# Altium PCB Copy of PCB.PcbDoc (part 4 of 5)
Units mm, origin at the board's own origin, x right, y up, seen from the top; angles counter-clockwise.
Board outline 130 x 115.04 mm, 6 copper layers (Top Layer, Int1 (GND), Int2, Int3 (PWR), Int4 (GND), Bottom Layer), stack 1.647 mm thick; 306 components, 246 nets, 1107 pads, 360 vias.
Unrouted connection lines stored in the file: 123.
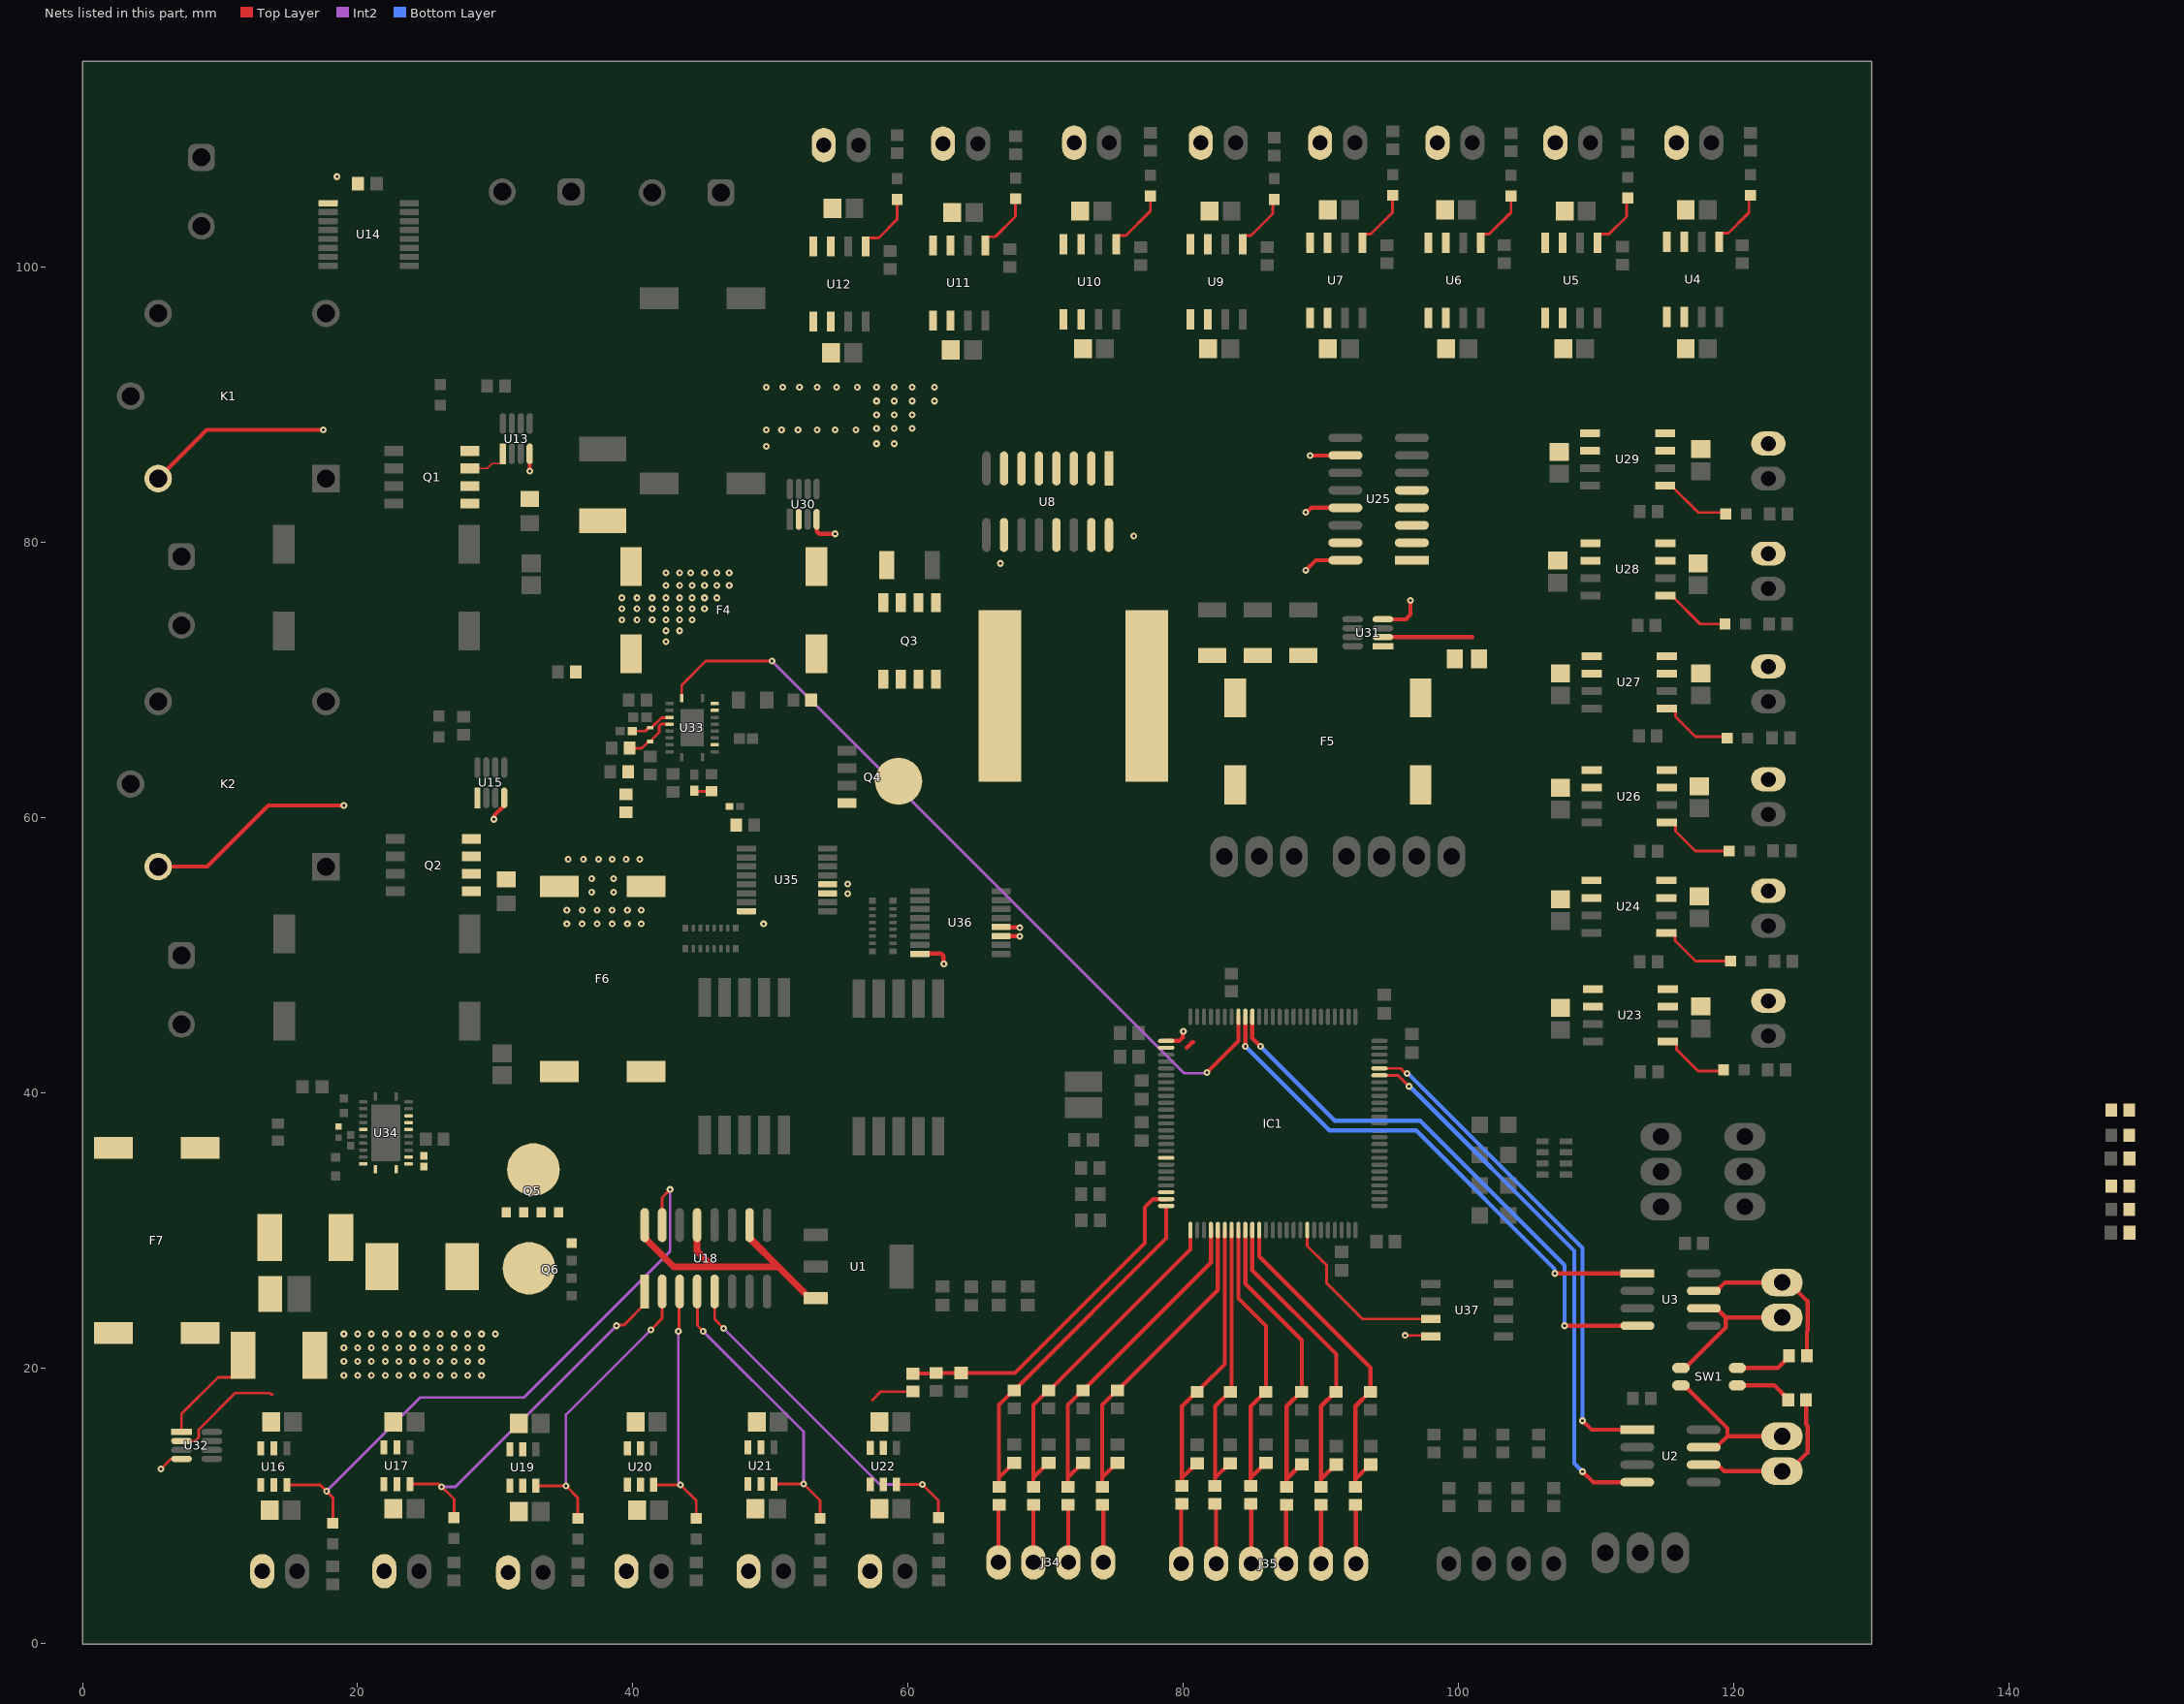
[diagram p6: the nets of this part, all layers, seen from the top]

## Part data (continued)
Y1: library part NX3225GD-8MHZ-STD-CRA-3, "CRYSTAL 8.0000MHZ 8PF SMD", ESR (Equivalent Series Resistance)="500 Ohms", Frequency Stability=±150ppm, Frequency Tolerance=±50ppm, Load Capacitance=8pF, manufacturer="NDK America, Inc.", Operating Mode=Fundamental, Operating Temperature="-40°C ~ 150°C", Package / Case="2-SMD, No Lead", Ratings=AEC-Q200, Supplier Part Number 1=644-1178-1-ND, componentlink1description=Datasheet, componentlink1url=http://www.ndk.com/images/products/catalog/c_NX3225GD-STD-CRA-3_e.pdf, componentlink2description="DigiKey Link", componentlink2url=https://www.digikey.com/en/products/detail/ndk-america-inc/NX3225GD-8MHZ-STD-CRA-3/3125637, Frequency="8 MHz", Height - Seated (Max)="0.039\" (1.00mm)", lastupdated="2/1/2024 9:48:41 PM", Lifecycle Status=Active, Minimum Order=1, Mounting Type="Surface Mount", packaging=TapeAndReel, Part Number=NX3225GD-8MHZ-STD-CRA-3, Part Status=Active, partid=744, price=0.48, series=NX3225GD, Size / Dimension="0.126\" L x 0.098\" W (3.20mm x 2.50mm)", Supplier 1=DigiKey, Type="MHz Crystal"

## Via types
v1: diameter 0.5, hole 0.2, Top Layer to Bottom Layer, 354 vias
v2: diameter 1, hole 0.75, Top Layer to Bottom Layer, 6 vias

## Nets (pads, with @x,y where several pads share a name; then routed paths per layer and width w, separated by ;. In a path a pad name is that pad's centre, name@x,y a point inside that pad or via, vN(x,y) a via of type N, cw(c..) or ccw(c..) an arc to the next point about the centre after c; other vN are vias at no path point)
5V_1_EN: D15.1 U16.3 U18.15 | length 45.1
  Top Layer w0.2: U16.3@14.85,11.531 17.269,11.531 v1(17.735,11.065) 18.2,10.6 D15.1@18.2,8.75 ; U18.15@42.125,30.416 42.125,32.425 v1(42.7,33)
  Int2 w0.2: v1(17.735,11.065) 24.552,17.883 32.083,17.883 42.7,28.5 v1(42.7,33)
5V_1_POWER: C37.2 J19.2 U16.1 U16.2
5V_2_EN: D16.1 U17.3 U18.1 | length 26.2
  Top Layer w0.2: U17.3@23.8,11.597 25.903,11.597 27,10.5 D16.1@27,9.15 ; v1(38.8,23.1) 38.853,23.153 39.35,23.153 40.855,24.658 U18.1@40.855,25.584
  Int2 w0.2: v1(26.1,11.4) 27.1,11.4 v1(38.8,23.1)
5V_2_POWER: C39.2 J20.2 U17.1 U17.2
5V_3_EN: D17.1 U18.2 U19.3 | length 21.9
  Top Layer w0.2: U19.3@32.95,11.466 v1(35.134,11.466) 36,10.6 D17.1@36,9.1 ; v1(41.3,22.8) 42.125,23.625 U18.2@42.125,25.584
  Int2 w0.2: v1(35.134,11.466) 35.134,16.633 v1(41.3,22.8)
5V_3_POWER: C41.2 J21.2 U19.1 U19.2
5V_4_EN: D18.1 U18.3 U20.3 | length 19
  Top Layer w0.2: U20.3@41.5,11.533 v1(43.467,11.533) 44.6,10.4 D18.1@44.6,9.1 ; v1(43.3,22.7) 43.348,22.748 43.348,25.536 U18.3@43.395,25.584
  Int2 w0.2: v1(43.3,22.7) 43.3,11.781 43.467,11.614 v1(43.467,11.533)
5V_4_POWER: C43.2 J22.2 U20.1 U20.2
5V_5_EN: D19.1 U18.4 U21.3 | length 22.3
  Top Layer w0.2: U18.4@44.665,25.584 44.683,25.566 44.683,23.118 v1(45.1,22.7) ; U21.3@50.25,11.6 v1(52.4,11.6) 53.6,10.4 D19.1@53.6,9.1
  Int2 w0.2: v1(45.1,22.7) 52.4,15.4 v1(52.4,11.6)
5V_5_POWER: C45.2 J23.2 U21.1 U21.2
5V_6_EN: D20.1 U18.5 U22.3 | length 26.9
  Top Layer w0.2: U18.5@45.935,25.584 45.935,23.565 v1(46.6,22.9) ; U22.3@59.15,11.566 v1(61.033,11.566) 62.2,10.4 D20.1@62.2,9.15
  Int2 w0.2: v1(46.6,22.9) 57.934,11.566 v1(61.033,11.566)
5V_6_POWER: C47.2 J24.2 U22.1 U22.2
5V_MCU_SENSE: C62.2 IC1.24 R29.2 R30.1 | length 25.2
  Top Layer w0.3: R29.2@60.343,19.613 60.368,19.638 62.018,19.638 R30.1@62.043,19.663 C62.2@63.843,19.663 67.763,19.663 77.2,29.1 77.2,31.7 77.8,32.3 IC1.24@78.75,32.3
5VCC: C34.2 C36.2 C38.2 C40.2 C42.2 C44.2 C46.2 K1.2 K2.2 R28.2 R29.1 U1.3 U8.10 U8.13 U8.16 U13.4 U14.9 U15.4 U16.5 U16.6 U17.5 U17.6 U18.10 U18.13 U18.16 U19.5 U19.6 U20.5 U20.6 U21.5 U21.6 U22.5 U22.6 U25.10 U25.13 U25.16 U30.4 U31.4 U32.2 U32.4 U35.3 U35.4 U35.16 U36.3 U36.4 U36.16 U37.8 | length 89.1
  Top Layer w0.2: v1(5.7,12.7) 6.4,13.4 7.175,13.4 U32.4@7.2,13.425 ; U32.2@7.2,14.725 8.183,14.725 8.441,14.983 8.441,15.545 11.096,18.2 13.6,18.2 13.686,18.114 13.798,18.114 ; 57.4,17.7 58.013,18.313 R29.1@60.343,18.313 ; v1(96.1,22.4) 97.894,22.4 U37.8@97.968,22.327
  Top Layer w0.3: K2.2@5.5,56.464 9.064,56.464 13.5,60.9 v1(19,60.9) ; K1.2@5.5,84.664 9.036,88.2 v1(17.5,88.2) ; v1(29.9,59.9) 29.938,59.938 29.938,60.202 30.65,60.914 U15.4@30.65,61.464 ; v1(32.5,85.2) U13.4@32.5,86.464 ; U30.4@53.35,81.7 53.375,81.675 53.375,80.825 53.55,80.65 v1(54.7,80.65) ; U36.16@60.85,50.125 60.875,50.15 62.386,50.15 62.562,49.974 62.562,49.438 v1(62.6,49.4) ; U36.3@66.75,51.425 66.763,51.413 68.087,51.413 v1(68.1,51.4) ; U36.4@66.75,52.075 66.771,52.054 68.076,52.054 v1(68.112,52.018) ; v1(88.9,78) 89.63,78.73 U25.16@91.768,78.73 ; v1(88.9,82.225) 88.954,82.225 89.269,82.54 U25.13@91.768,82.54 ; v1(89.2,86.325) 89.212,86.337 91.755,86.337 U25.10@91.768,86.35 ; U31.4@94.5,74.439 96.164,74.439 96.5,74.775 v1(96.5,75.8)
  Top Layer w0.5: U18.16@40.855,30.416 40.855,29.49 42.962,27.383 45.8,27.383 ; U18.13@44.665,30.416 44.665,28.518 45.8,27.383 ; U18.10@48.475,30.416 48.475,29.475 50.567,27.383 ; U1.3@53.275,25.1 52.85,25.1 50.567,27.383 ; 45.8,27.383 50.567,27.383
  other v1: 19,19.5 20,19.5 21,19.5 22,19.5 23,19.5 24,19.5 25,19.5 26,19.5 27,19.5 28,19.5 29,19.5 19,20.5 20,20.5 21,20.5 22,20.5 23,20.5 24,20.5 25,20.5 26,20.5 27,20.5 28,20.5 29,20.5 19,21.5 20,21.5 21,21.5 22,21.5 23,21.5 24,21.5 25,21.5 26,21.5 27,21.5 28,21.5 29,21.5 19,22.5 20,22.5 21,22.5 22,22.5 23,22.5 24,22.5 25,22.5 26,22.5 27,22.5 28,22.5 29,22.5 30,22.5 49.5,52.3 55.6,54.5 55.6,55.2 66.7,78.5 76.4,80.5 18.5,106.6
5VCC_NOSENS: F7.2_1 F7.2_2 R28.1 U32.1 | length 8
  Top Layer w0.2: U32.1@7.2,15.375 7.2,16.7 9.855,19.355 10.875,19.355 11.675,20.155 R28.1@11.675,20.955
5VREG_HO: Q5.4 U34.13
5VREG_IN: F6.2_1 F6.2_2 Q5.5-6-7-8 U34.12 U34.19
5VREG_ISNS+: L2.2 R42.1 U34.20
5VREG_LO: Q6.4 U34.11
5VREG_OUT: C74.1 L2.1 Q5.1 Q5.2 Q5.3 Q6.5-6-7-8 U34.14
5VREG_VOUT: C77.1 F7.1_1 F7.1_2 R42.2 U34.21
12V_1_EN: D21.1 U23.5 U25.15 | length 5.2
  Top Layer w0.2: U23.5@115.2,43.754 115.651,43.754 115.831,43.575 115.831,43.169 117.4,41.6 119.15,41.6 D21.1@119.25,41.7
12V_1_POWER: C49.2 J25.1 U23.7 U23.8
12V_2_EN: D22.1 U24.5 U25.1 | length 5.7
  Top Layer w0.2: U24.5@115.1,51.654 115.551,51.654 115.731,51.475 115.731,51.069 117.2,49.6 D22.1@119.75,49.6
12V_2_POWER: C51.2 J26.1 U24.7 U24.8
12V_3_EN: D23.1 U25.2 U26.5 | length 5.6
  Top Layer w0.2: U26.5@115.125,59.659 115.576,59.659 115.756,59.48 115.756,59.044 117.2,57.6 D23.1@119.65,57.6
12V_3_POWER: C53.2 J27.1 U26.7 U26.8
12V_4_EN: D24.1 U25.3 U27.5 | length 5.5
  Top Layer w0.2: U27.5@115.125,67.959 115.576,67.959 115.756,67.78 115.756,67.344 117.2,65.9 119.4,65.9 D24.1@119.5,65.8
12V_4_POWER: C55.2 J28.1 U27.7 U27.8
12V_5_EN: D25.1 U25.4 U28.5 | length 5.2
  Top Layer w0.2: U28.5@115.025,76.159 115.476,76.159 117.535,74.1 D25.1@119.35,74.1
12V_5_POWER: C57.2 J29.1 U28.7 U28.8
12V_6_EN: D26.1 U25.5 U29.5 | length 5.3
  Top Layer w0.2: U29.5@115,84.154 115.451,84.154 117.405,82.2 119.3,82.2 D26.1@119.4,82.1
12V_6_POWER: C59.2 J30.1 U29.7 U29.8
12V_MCU_SENSE: C61.2 IC1.23 R26.2 R27.1
12V_REG_EN: IC1.93 R31.1 U33.1 | length 57.2
  Top Layer w0.2: U33.1@43.55,68.714 43.55,69.65 45.3,71.4 v1(50.1,71.4)
  Top Layer w0.3: v1(81.7,41.5) 84,43.8 IC1.93@84,45.55
  Int2 w0.2: v1(50.1,71.4) 80.05,41.45 81.65,41.45 v1(81.7,41.5)
12VCC: C48.1 C50.1 C52.1 C54.1 C56.1 C58.1 R23.2 R26.1 U23.1 U23.2 U24.1 U24.2 U26.1 U26.2 U27.1 U27.2 U28.1 U28.2 U29.1 U29.2 U31.2 | length 6.5
  Top Layer w0.3: U31.2@94.5,73.139 100.986,73.139 101,73.125
12VCC_NOSENS: F5.2_1 F5.2_2 R23.1 U31.1
12VREG_HO: Q3.4 U33.18
12VREG_IN: C64.2 F4.2_1 F4.2_2 Q3.5 Q3.6 Q3.7 Q3.8 R32.2
12VREG_LO: Q4.4 U33.13
12VREG_OUT: C65.2 C66.2 C67.2 F5.1_1 F5.1_2 L1.1 R34.2 R35.2
12VREG_SW: C68.2 L1.2 Q3.1 Q3.2 Q3.3 Q4.5-6-7-8 R37.2 U33.19 | length 1.2
  Top Layer w0.2: R37.2@44.475,61.989 44.525,61.939 C68.2@45.7,61.939
24V_1_EN: D5.1 U4.5 U8.15 | length 4.6
  Top Layer w0.2: U4.5@118.94,101.864 118.94,102.315 119.119,102.495 119.595,102.495 121.1,104 121.1,105.15 D5.1@121.2,105.25
24V_1_POWER: C18.2 J8.1 U4.7 U4.8
24V_2_EN: D6.1 U5.5 U8.1 | length 4.5
  Top Layer w0.2: U5.5@110.105,101.789 110.105,102.24 110.284,102.42 110.92,102.42 112.2,103.7 112.2,104.95 D6.1@112.3,105.05
24V_2_POWER: C20.2 J9.1 U5.7 U5.8
24V_3_EN: D7.1 U6.5 U8.2 | length 4.6
  Top Layer w0.2: U6.5@101.605,101.789 101.605,102.24 101.784,102.42 102.22,102.42 103.8,104 D7.1@103.8,105.2
24V_3_POWER: C22.2 J10.1 U6.7 U6.8
24V_4_EN: D8.1 U7.5 U8.3 | length 4.6
  Top Layer w0.2: U7.5@93.005,101.789 93.005,102.24 93.184,102.42 93.62,102.42 95.2,104 D8.1@95.2,105.25
24V_4_POWER: C24.2 J11.1 U7.7 U7.8
24V_5_EN: D9.1 U8.4 U9.5 | length 4.5
  Top Layer w0.2: U9.5@84.305,101.689 84.305,102.14 84.484,102.32 84.92,102.32 86.5,103.9 86.5,104.85 D9.1@86.6,104.95
24V_5_POWER: C26.2 J12.1 U9.7 U9.8
24V_6_EN: D10.1 U8.5 U10.5 | length 4.9
  Top Layer w0.2: U10.5@75.105,101.689 75.105,102.14 75.284,102.32 75.82,102.32 77.6,104.1 D10.1@77.6,105.2
24V_6_POWER: C28.2 J13.1 U10.7 U10.8
24V_7_EN: D11.1 U8.6 U11.5 | length 4.6
  Top Layer w0.2: U11.5@65.61,101.6 65.61,102.051 65.789,102.231 66.331,102.231 67.8,103.7 D11.1@67.8,105
24V_7_POWER: C30.2 J14.1 U11.7 U11.8
24V_8_EN: D12.1 U8.7 U12.5 | length 4.8
  Top Layer w0.2: U12.5@56.905,101.525 56.905,101.976 57.084,102.156 57.856,102.156 59.2,103.5 D12.1@59.2,104.95
24V_8_POWER: C32.2 J15.1 U12.7 U12.8
24V_MCU_SENSE: C60.2 IC1.18 R24.2 R25.1
24VCC: C17.1 C19.1 C21.1 C23.1 C25.1 C27.1 C29.2 C31.2 F4.1_1 F4.1_2 F6.1_1 F6.1_2 R22.2 R24.1 U4.1 U4.2 U5.1 U5.2 U6.1 U6.2 U7.1 U7.2 U9.1 U9.2 U10.1 U10.2 U11.1 U11.2 U12.1 U12.2 U30.2
  other v1: 35.2,52.3 36.3,52.3 37.4,52.3 38.5,52.3 39.6,52.3 40.6,52.3 35.2,53.3 36.3,53.3 37.4,53.3 38.5,53.3 39.6,53.3 40.6,53.3 37,54.6 38.6,54.6 37,55.6 38.6,55.6 35.3,57 36.4,57 37.5,57 38.5,57 39.5,57 40.5,57 42.4,72.8 42.4,73.6 43.4,73.6 39.2,74.4 40.3,74.4 41.4,74.4 42.4,74.4 43.4,74.4 44.3,74.4 39.2,75.2 40.3,75.2 41.4,75.2 42.4,75.2 43.4,75.2 44.3,75.2 45.2,75.2 39.2,76 40.3,76 41.4,76 42.4,76 43.4,76 44.3,76 45.2,76 46.1,76 42.4,76.9 43.4,76.9 44.3,76.9 45.2,76.9 46.1,76.9 47,76.9 42.4,77.8 43.4,77.8 44.2,77.8 45.2,77.8 46.1,77.8 47,77.8 49.7,87 57.7,87.2 59,87.2 49.7,88.2 50.8,88.2 52,88.2 53.4,88.2 54.7,88.2 56.2,88.2 57.7,88.3 59,88.3 60.3,88.3 57.7,89.3 59,89.3 60.3,89.3 57.7,90.3 59,90.3 60.3,90.3 61.9,90.3 49.7,91.3 50.9,91.3 52.1,91.3 53.4,91.3 54.8,91.3 56.3,91.3 57.7,91.3 59,91.3 60.3,91.3 61.9,91.3
Ain_5V1: J34.1 R74.2 | length 4.2
  Top Layer w0.3: R74.2@74.1,10.1 74.18,10.02 J34.1@74.18,5.9
Ain_5V2: J34.2 R76.2 | length 4.2
  Top Layer w0.3: R76.2@71.6,10.1 71.64,10.06 J34.2@71.64,5.9
Ain_5V3: J34.3 R78.2 | length 4.2
  Top Layer w0.3: J34.3@69.1,5.9 R78.2@69.1,10.1
Ain_5V4: J34.4 R80.2 | length 4.2
  Top Layer w0.3: J34.4@66.56,5.9 66.56,10.06 R80.2@66.6,10.1
Ain_12V1: J35.1 R82.1 | length 4.3
  Top Layer w0.3: R82.1@92.5,10.1 92.54,10.06 J35.1@92.54,5.8
Ain_12V2: J35.2 R84.1 | length 4.3
  Top Layer w0.3: J35.2@90,5.8 R84.1@90,10.1
Ain_12V3: J35.3 R86.1 | length 4.3
  Top Layer w0.3: J35.3@87.46,5.8 87.46,10.06 R86.1@87.5,10.1
Ain_12V4: J35.4 R88.1 | length 4.4
  Top Layer w0.3: R88.1@84.9,10.15 84.92,10.13 J35.4@84.92,5.8
Ain_12V5: J35.5 R90.1 | length 4.4
  Top Layer w0.3: R90.1@82.3,10.15 82.38,10.07 J35.5@82.38,5.8
Ain_12V6: J35.6 R92.1 | length 4.4
  Top Layer w0.3: J35.6@79.84,5.8 79.84,10.09 R92.1@79.9,10.15
Analog_5V1: C78.1 IC1.30 R73.2 R74.1 | length 23.7
  Top Layer w0.3: R74.1@74.1,11.4 74.1,12.075 ; C78.1@75.2,13.125 75.15,13.125 74.1,12.075 ; IC1.30@82.5,30.05 82.5,25.7 75.525,18.725 75.525,18.675 75.25,18.4 R73.2@75.2,18.4 75.15,18.4 74.1,17.35 74.1,12.075
Analog_5V2: C79.1 IC1.29 R75.2 R76.1 | length 24.6
  Top Layer w0.3: R76.1@71.6,11.4 71.6,12.075 ; C79.1@72.7,13.125 72.65,13.125 71.6,12.075 ; IC1.29@82,30.05 82,27.7 73.025,18.725 73.025,18.675 72.75,18.4 R75.2@72.7,18.4 72.65,18.4 71.6,17.35 71.6,12.075
Analog_5V3: C80.1 IC1.26 R77.2 R78.1 | length 25
  Top Layer w0.3: R78.1@69.1,11.4 69.1,12.075 ; C80.1@70.2,13.125 70.15,13.125 69.1,12.075 ; IC1.26@80.5,30.05 80.5,28.65 70.25,18.4 R77.2@70.2,18.4 70.15,18.4 69.1,17.35 69.1,12.075
Analog_5V4: C81.1 IC1.25 R79.2 R80.1 | length 27
  Top Layer w0.3: R80.1@66.6,11.4 66.6,12.1 ; C81.1@67.7,13.125 67.65,13.125 66.625,12.1 66.6,12.1 ; IC1.25@78.75,31.8 78.75,29.45 68.025,18.725 68.025,18.675 67.75,18.4 R79.2@67.7,18.4 67.65,18.4 66.6,17.35 66.6,12.1
Analog_12V1: C82.1 IC1.36 R81.1 R82.2 | length 24
  Top Layer w0.3: IC1.36@85.5,30.05 85.5,28.138 93.6,20.038 R81.1@93.6,18.3 93.55,18.3 92.5,17.25 92.5,11.95 ; R82.2@92.5,11.4 92.5,11.95 ; C82.1@93.6,13 93.55,13 92.5,11.95
Analog_12V2: C83.1 IC1.35 R83.1 R84.2 | length 23.2
  Top Layer w0.3: IC1.35@85,30.05 85,27.138 91.1,21.038 R83.1@91.1,18.3 91.05,18.3 90,17.25 90,11.95 ; R84.2@90,11.4 90,11.95 ; C83.1@91.1,13 91.05,13 90,11.95
Analog_12V3: C84.1 IC1.34 R85.1 R86.2 | length 22.4
  Top Layer w0.3: IC1.34@84.5,30.05 84.5,26.138 88.6,22.038 R85.1@88.6,18.3 88.55,18.3 87.5,17.25 87.5,11.975 ; R86.2@87.5,11.4 87.5,11.975 ; C84.1@88.6,13.025 88.55,13.025 87.5,11.975
Analog_12V4: C85.1 IC1.33 R87.1 R88.2 | length 21.4
  Top Layer w0.3: IC1.33@84,30.05 84,25.088 86,23.088 R87.1@86,18.3 85.95,18.3 84.9,17.25 84.9,12.075 ; R88.2@84.9,11.45 84.9,12.075 ; C85.1@86,13.125 85.95,13.125 84.9,12.075
Analog_12V5: C86.1 IC1.32 R89.1 R90.2 | length 20.7
  Top Layer w0.3: R90.2@82.3,11.45 82.3,12.05 ; C86.1@83.4,13.1 83.35,13.1 82.3,12.05 ; IC1.32@83.5,30.05 83.5,18.4 R89.1@83.4,18.3 83.35,18.3 82.3,17.25 82.3,12.05
Analog_12V6: C87.1 IC1.31 R91.1 R92.2 | length 21.5
  Top Layer w0.3: R92.2@79.9,11.45 79.9,12.05 ; C87.1@81,13.1 80.95,13.1 79.9,12.05 ; IC1.31@83,30.05 83,20.3 81.325,18.625 81.325,18.575 81.05,18.3 R91.1@81,18.3 80.95,18.3 79.9,17.25 79.9,12.05
CAN1_N: J6.1 R5.2 U2.6 | length 12.2
  Top Layer w0.3: U2.6@117.8,13 118.811,13 119.281,12.53 J6.1@123.5,12.53 124,12.53 125.35,13.88 125.35,15.828 125.25,15.928 R5.2@125.25,17.7
CAN1_P: J6.2 SW1.4 U2.7 | length 11.3
  Top Layer w0.3: SW1.4@116.15,18.765 116.405,18.765 119.524,15.646 119.524,15.07 ; U2.7@117.8,14.27 118.724,14.27 119.524,15.07 ; J6.2@123.5,15.07 119.524,15.07
CAN1_RX: IC1.70 U2.4 | length 40
  Top Layer w0.2: IC1.70@94.25,41.3 95.6,41.3 v1(96.4,40.5)
  Top Layer w0.3: v1(109,12.5) 109.77,11.73 U2.4@112.973,11.73
  Bottom Layer w0.3: v1(96.4,40.5) 96.449,40.5 108.4,28.549 108.4,13.1 v1(109,12.5)
CAN1_TERM: R5.1 SW1.1 | length 4.2
  Top Layer w0.3: SW1.1@120.25,18.765 122.935,18.765 123.95,17.75 R5.1@123.95,17.7
CAN1_TX: IC1.71 U2.1 | length 37
  Top Layer w0.2: IC1.71@94.25,41.8 95.8,41.8 96.161,41.439 v1(96.239,41.439)
  Top Layer w0.3: v1(109,16.2) 109.66,15.54 U2.1@112.973,15.54
  Bottom Layer w0.3: v1(96.239,41.439) 96.277,41.401 96.348,41.401 109,28.749 v1(109,16.2)
CAN2_N: J7.1 SW1.3 U3.6 | length 11.2
  Top Layer w0.3: SW1.3@116.15,20.035 116.471,20.035 119.402,22.967 119.402,23.7 ; U3.6@117.814,24.365 118.737,24.365 119.402,23.7 ; J7.1@123.5,23.7 119.402,23.7
CAN2_P: J7.2 R4.1 U3.7 | length 12.4
  Top Layer w0.3: U3.7@117.814,25.635 118.737,25.635 119.342,26.24 J7.2@123.5,26.24 124,26.24 125.35,24.89 125.35,22.767 125.3,22.717 R4.1@125.3,20.9
CAN2_RX: IC1.91 U3.4 | length 40.8
  Top Layer w0.3: IC1.91@85,45.55 85,44 v1(85.6,43.4) ; v1(107.7,23.1) 107.702,23.098 112.984,23.098 U3.4@112.986,23.095
  Bottom Layer w0.3: v1(85.6,43.4) 91,38 97.2,38 107.7,27.5 v1(107.7,23.1)
CAN2_TERM: R4.2 SW1.2 | length 4.1
  Top Layer w0.3: SW1.2@120.25,20.035 123.185,20.035 124,20.85 R4.2@124,20.9
CAN2_TX: IC1.92 U3.1 | length 37.6
  Top Layer w0.3: v1(84.5,43.4) IC1.92@84.5,45.55 ; v1(107,26.9) 108.577,26.9 108.582,26.905 U3.1@112.986,26.905
  Bottom Layer w0.3: v1(84.5,43.4) 90.6,37.3 96.9,37.3 106.962,27.238 106.962,26.938 v1(107,26.9)
CBOOT: C74.2 U34.15
COMP: C72.1 C73.1 U33.4 | length 3.1
  Top Layer w0.2: C72.1@39.94,66.314 40.9,66.314 41.15,66.564 C73.1@41.25,66.564 41.35,66.564 42.075,67.289 42.625,67.289 U33.4@42.65,67.314
EEPROM_WL: IC1.43 U37.7 | length 13.1
  Top Layer w0.2: IC1.43@89,30.05 89,28.9 90.4,27.5 90.4,26.2 93.003,23.597 U37.7@97.968,23.597
FB: R41.1 U34.6
FEEDBACK: C69.1 C73.2 R35.1 R39.2 R40.2 U33.5 | length 3.9
  Top Layer w0.2: R40.2@39.75,65.064 40.65,65.064 41.15,65.564 C73.2@41.25,65.564 41.35,65.564 41.386,65.6 41.386,65.7 41.91,66.224 41.91,66.675 42.049,66.814 U33.5@42.65,66.814
FET1_OUT: Q1.1 Q1.2 Q1.3 R14.1 U13.1 | length 3.1
  Top Layer w0.1: Q1.3@28.17,85.399 29.408,85.399 29.77,85.761 30.373,85.761 30.55,85.939 U13.1@30.55,86.464
FET2_OUT: Q2.1 Q2.2 Q2.3 R15.1 U15.1
FET_CTRL_1: IC1.1 Q1.4 | length 1.8
  Top Layer w0.3: IC1.1@78.75,43.8 79.7,43.8 79.962,44.062 79.962,44.462 v1(80,44.5)
FET_CTRL_2: IC1.2 Q2.4 | length 0.6
  Top Layer w0.3: 80.246,43.3 80.646,43.7 80.7,43.7

## Text inside footprints (layer, text, board x,y; h text height)
U4: Top Overlay "*" at 114.7,95.764 h1.27 r90; Mechanical 13 "*" at 115.879,97.209 h1.27 r90
U5: Top Overlay "*" at 105.8,95.664 h1.27 r90; Mechanical 13 "*" at 107.044,97.134 h1.27 r90
U6: Top Overlay "*" at 97.3,95.664 h1.27 r90; Mechanical 13 "*" at 98.544,97.134 h1.27 r90
U7: Top Overlay "*" at 88.7,95.664 h1.27 r90; Mechanical 13 "*" at 89.944,97.134 h1.27 r90
U9: Top Overlay "*" at 80,95.564 h1.27 r90; Mechanical 13 "*" at 81.244,97.034 h1.27 r90
U10: Top Overlay "*" at 70.8,95.564 h1.27 r90; Mechanical 13 "*" at 72.044,97.034 h1.27 r90
U11: Top Overlay "*" at 61.5,95.2 h1.27 r90; Mechanical 13 "*" at 62.549,96.945 h1.27 r90
U12: Top Overlay "*" at 52.7,95.4 h1.27 r90; Mechanical 13 "*" at 53.844,96.87 h1.27 r90
U16: Top Overlay "*" at 12.4,10.7 h1.27 r90; Mechanical 13 "*" at 13.773,12.102 h1.27 r90
U17: Top Overlay "*" at 21.3,10.7 h1.27 r90; Mechanical 13 "*" at 22.723,12.169 h1.27 r90
U19: Top Overlay "*" at 30.6,10.566 h1.27 r90; Mechanical 13 "*" at 31.873,12.038 h1.27 r90
U20: Top Overlay "*" at 39.15,10.666 h1.27 r90; Mechanical 13 "*" at 40.423,12.104 h1.27 r90
U21: Top Overlay "*" at 47.8,10.733 h1.27 r90; Mechanical 13 "*" at 49.173,12.171 h1.27 r90
U22: Top Overlay "*" at 56.8,10.7 h1.27 r90; Mechanical 13 "*" at 58.073,12.138 h1.27 r90
U23: Top Overlay "*" at 108.9,47.964 h1.27; Mechanical 13 "*" at 110.545,46.815 h1.27
U24: Top Overlay "*" at 108.8,55.764 h1.27; Mechanical 13 "*" at 110.445,54.715 h1.27
U26: Top Overlay "*" at 109,63.964 h1.27; Mechanical 13 "*" at 110.47,62.72 h1.27
U27: Top Overlay "*" at 109,72.164 h1.27; Mechanical 13 "*" at 110.47,71.02 h1.27
U28: Top Overlay "*" at 108.9,80.364 h1.27; Mechanical 13 "*" at 110.37,79.22 h1.27
U29: Top Overlay "*" at 108.9,88.364 h1.27; Mechanical 13 "*" at 110.345,87.215 h1.27